# Altium PCB PCI Express Mini L1.PCBDOC (part 6 of 7)
Units mm, origin at the board's own origin, x right, y up, seen from the top; angles counter-clockwise.
Board outline 70 x 83.2 mm, 6 copper layers (TopLayer, Layer 1, Layer 2, Layer 3, Layer 4, Bottom Layer), stack 0.914 mm thick; 402 components, 242 nets, 1301 pads, 522 vias.
Unrouted connection lines stored in the file: 225.
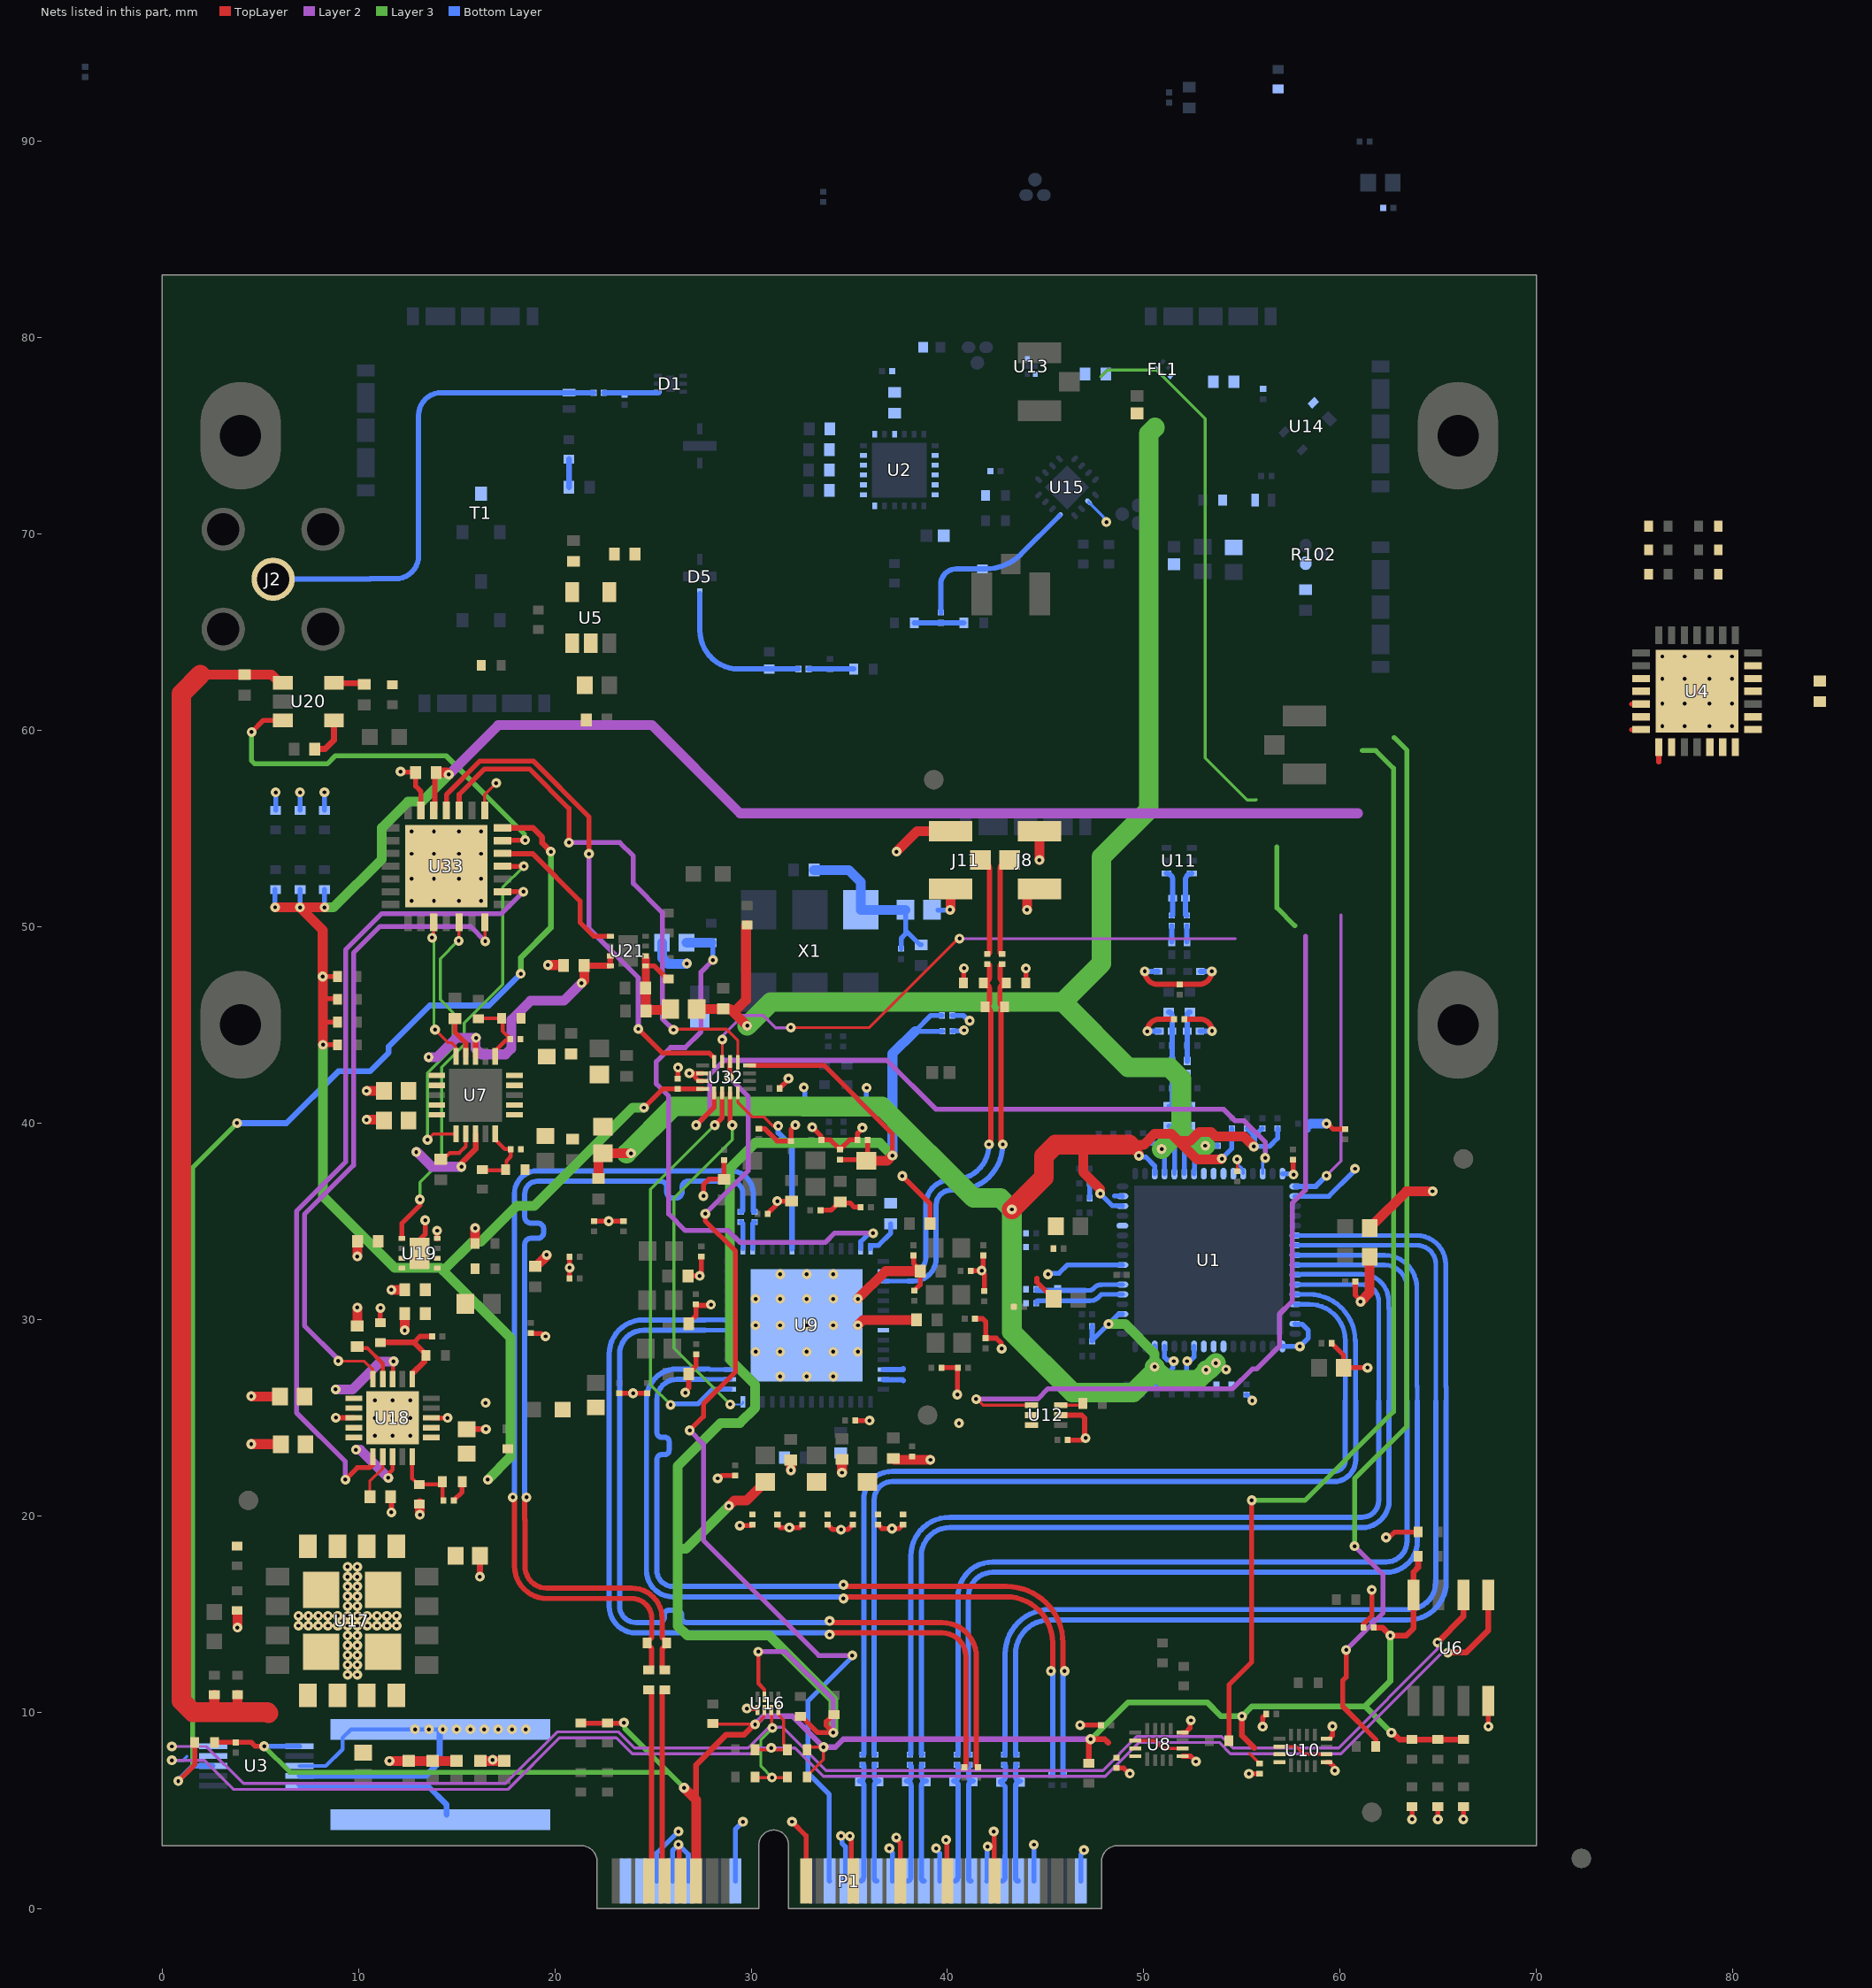
[diagram p7: the nets of this part, all layers, seen from the top]

## Via types
v1: diameter 0.5, hole 0.2, TopLayer to Bottom Layer, tented both sides, 311 vias
v2: diameter 0.5, hole 0.2, TopLayer to Bottom Layer, 211 vias

## Nets (pads, with @x,y where several pads share a name; then routed paths per layer and width w, separated by ;. In a path a pad name is that pad's centre, name@x,y a point inside that pad or via, vN(x,y) a via of type N, cw(c..) or ccw(c..) an arc to the next point about the centre after c; other vN are vias at no path point) (continued)
2V5@1A: C68.2 C99.2 C100.2 C101.2 C102.2 C103.2 C104.2 C105.2 C106.2 C107.2 C108.2 C109.2 C110.2 C111.2 FB7.2 U1.3 U1.8 U1.9 U1.10 U1.11 U1.39 U1.40 U1.41 U1.46 U1.50 U1.51 U1.62 U1.63 | length 86.1
  TopLayer w0.5: C68.2@22.227,37.183 22.227,38.266 22.428,38.466 FB7.2@22.448,38.466 v1@23.875,38.466 ; 46.921,38.898 46.921,37.495 47.775,36.641 v2(47.775,36.404) ; v1(49.749,38.329) 49.749,38.408 49.259,38.898 50.001,38.898 50.552,39.449 51.408,39.449 51.769,39.088 ; v2(53.969,38.188) 53.927,38.146 52.711,38.146 51.769,39.088 ; v1(55.603,38.802) 55.09,39.315 53.649,39.315 53.418,39.546 52.822,39.546 52.365,39.088 51.769,39.088
  TopLayer w1: v1(43.277,35.602) 44.913,37.238 44.913,38.312 45.499,38.898 46.921,38.898 49.259,38.898
  Layer 3 w0.5: v1(48.208,29.765) 49.051,29.765 50.552,28.264 v2(50.552,27.588)
  Layer 3 w1: v1@23.662,38.45 26.063,40.852 32.645,40.852 32.656,40.842 36.67,40.842 41.324,36.188 42.691,36.188 v1(43.277,35.602) 43.277,29.362 46.369,26.27 49.451,26.27 v2@50.617,27.437 ; v2(50.552,27.588) 50.552,27.503 51.13,26.925 52.766,26.925 v2@53.222,27.381 ; v2(53.178,27.426) 53.315,27.426 v2(53.671,27.782)
  Bottom Layer w0.25: C102.2@47.237,36.178 C100.2@47.237,36.924 47.237,36.934 47.262,36.959 47.432,36.959 ; C99.2@47.356,29.656 47.367,29.656 C101.2@47.367,28.893 47.392,28.918 47.392,28.948 48.708,30.265 48.899,30.265 U1.51@48.908,30.275 ; v2(47.775,36.404) 48.395,35.784 48.899,35.784 U1.62@48.908,35.775 ; v1@48.218,29.775 U1.50@48.908,29.775 ; 48.498,36.284 48.899,36.284 U1.63@48.908,36.275 ; C103.2@49.204,38.953 49.214,38.953 49.239,38.928 49.239,38.918 v1@49.789,38.368 ; v1@49.881,38.277 50.096,38.277 50.553,37.819 50.553,37.43 U1.3@50.558,37.425 ; v2(53.969,38.188) 54.483,38.702 C104.2@54.483,39.723 ; C105.2@55.258,39.723 55.268,39.723 55.293,39.698 55.293,39.688 55.555,39.427 55.555,38.85 v1(55.603,38.802) ; C106.2@56.033,39.723 56.023,39.723 55.651,39.351 55.651,38.85 v1(55.603,38.802) ; C107.2@56.808,39.723 56.808,39.22 56.39,38.802 v1(55.603,38.802)
  Bottom Layer w0.3: U1.46@50.558,28.625 50.558,27.632 50.652,27.539 C111.2@50.652,26.696
  other v1: 23.882,38.459
  other v2: 54.185,27.454
3V3@0A5: C78.2 C122.2 C123.2 C124.2 C125.2 FB1.1 FB4.2 R77.2 U1.4 U1.7 U1.42 U1.45 | length 78.8
  TopLayer w0.5: FB4.2@27.239,45.806 27.241,45.807 28.947,45.807 v1(29.801,44.954) 29.12,45.635 ; 29.195,45.709 29.74,46.255 29.74,50.019 29.776,50.055 R77.2@29.801,50.08
  Layer 3 w1: v1(29.801,44.954) 31.007,46.16 45.876,46.16 ; 50.566,75.414 50.25,75.099 50.25,55.95 47.841,53.541 47.841,48.124 45.876,46.16 ; v2(50.912,38.677) 51.849,39.614 51.903,39.56 ; v2(53.128,38.846) 52.617,38.846 51.903,39.56 ; 45.876,46.16 49.206,42.83 51.317,42.83 51.903,42.245 51.903,39.56
  Bottom Layer w0.25: C125.2@49.95,38.96 50.628,38.96 v2(50.912,38.677) 51.058,38.53 U1.4@51.058,37.425 ; U1.45@51.058,28.625 51.058,28.071 51.205,27.925 51.405,27.925 51.468,27.862 51.508,27.862 51.474,27.828 51.474,27.529 51.414,27.468 C123.2@51.414,26.689 ; C122.2@52.183,26.701 52.183,27.78 v1@52.278,27.875 ; v1(52.208,27.875) v1@52.278,27.875 ; U1.42@52.558,28.625 52.558,28.086 52.347,27.875 v1@52.278,27.875 ; U1.7@52.558,37.425 52.568,37.434 52.568,37.62 52.576,37.627 52.576,38.441 52.98,38.846 v2(53.128,38.846) C124.2@53.76,38.846
  other v1: 51.522,27.876
3V3@1A_1: C53.2 C54.2 C94.2 C150.2 C151.2 C154.2 C155.2 C166.2 C167.2 C195.2 C196.2 C207.2 C208.2 C240.2 C241.2 C242.2 FB15.1 FB16.1 FB19.1 FB23.1 FB26.1 R22.2 R23.2 R24.2 R30.2 R33.2 R34.2 R37.1 R38.1 R42.1 R43.2 R44.2 R52.1 R64.2 R78.2 U4.5 U12.5 U12.6 U16.7 U18.11 U18.12 U32.8 U32.16 U33.5 | length 211.7
  TopLayer w0.2: v1(30.366,13.078) 30.366,11.459 30.676,11.149 U16.7@30.676,10.779
  TopLayer w0.25: v2(8.184,47.461) R37.1@8.928,47.461 ; v2(8.2,43.984) R52.1@8.944,43.984 ; 8.2,45.148 R42.1@8.94,45.148 ; 8.2,46.326 R38.1@8.944,46.326 ; U33.5@13.832,55.929 13.892,55.989 13.892,57.765 C242.2@13.965,57.838 ; C53.2@14.859,20.784 14.859,20.794 15.281,21.215 R64.2@15.281,21.734 ; v1(24.541,40.783) 25.495,41.736 C240.2@26.262,41.736 U32.8@27.524,41.736 ; U32.16@29.924,42.936 33.708,42.936 37.195,39.449 v1(37.195,38.347) ; R43.2@32.509,9.79 32.559,9.79 33.391,8.958 v1(34.181,8.958) 33.821,9.318 33.821,9.524 34.171,9.874 R44.2@34.221,9.874 ; C154.2@34.529,38.14 35.814,38.14 FB16.1@35.866,38.088 35.941,38.163 C155.2@35.941,39.141
  TopLayer w0.5: v2(5.761,50.988) 5.769,50.98 v2(7.025,50.98) ; v2(8.2,43.984) 8.2,45.148 8.2,46.326 8.2,47.446 v2(8.184,47.461) 8.184,49.821 v2(7.025,50.98) ; v2(8.275,50.984) 8.271,50.98 v2(7.025,50.98) ; C242.2@13.965,57.838 13.978,57.851 14.506,57.851 v1(14.604,57.753) ; v1(28.869,20.5) 29.152,20.783 29.78,20.783 FB15.1@30.726,21.729 ; FB16.1@35.866,38.088 36.936,38.088 v1(37.195,38.347)
  Layer 2 w0.25: v1(30.366,13.078) 31.741,13.078 34.181,10.638 v1(34.181,8.958)
  Layer 2 w0.5: v1(14.604,57.753) 17.126,60.275 24.943,60.275 29.444,55.774 60.899,55.774
  Layer 3 w0.5: v2(8.2,43.984) 8.2,36.267 11.847,32.619 14.192,32.619 14.33,32.481 ; v2(8.275,50.984) 8.738,50.984 11.182,53.429 11.182,55.029 12.532,56.379 13.23,56.379 v1(14.604,57.753) ; v1(16.589,21.84) 17.748,22.999 17.748,29.063 14.33,32.481 ; v1(24.541,40.783) 23.959,40.783 18.957,35.78 18.066,35.78 16.236,33.951 15.799,33.951 14.33,32.481 ; v1(28.869,20.5) 26.694,18.325 26.259,18.325 ; v1(34.181,8.958) 34.181,10.648 30.926,13.903 26.748,13.903 26.259,14.392 26.259,18.325 ; v1(37.195,38.347) 36.553,38.99 30.194,38.99 28.91,37.706 28.91,27.959 30.194,26.676 30.194,25.483 29.425,24.714 28.447,24.714 26.259,22.526 26.259,18.325
  Bottom Layer w0.25: R30.2@5.758,51.902 5.759,51.9 5.759,50.99 v2(5.761,50.988) ; v2(7.025,50.98) 7.034,50.989 7.034,51.885 R34.2@7.042,51.894 ; v2(8.275,50.984) R33.2@8.275,51.898 ; C208.2@39.716,45.481 39.148,45.481 38.353,44.686 38.363,44.676 C207.2@39.737,44.676 C207.2@39.726,44.686
  Bottom Layer w0.5: v1(37.195,38.347) 37.195,43.528 38.353,44.686
3V3_MB: C19.1 C44.2 C50.2 C243.1 P1.11 R16.2 R17.1 R21.2 R27.2 R48.2 R54.2 R69.2 R72.1 R83.2 R111.1 R112.1 U3.6 U6.8 U8.6 U8.14 U8.15 U8.16 U10.6 U10.14 U10.15 U10.16 U16.2 | length 107.9
  TopLayer w0.15: R72.1@28.05,9.419 28.074,9.396 30.174,9.396 v1@30.18,9.389 ; v1@30.363,9.463 30.651,9.751 30.651,9.919 30.676,9.944 U16.2@30.676,10.109 ; R17.1@32.849,6.705 32.849,6.755 33.685,7.591 v1(33.685,8.219) 32.987,8.219 R16.2@32.849,8.081 ; U8.14@49.57,8.558 50.558,8.558 50.958,8.158 U8.6@51.97,8.158 ; 55.404,7.879 C19.1@55.895,7.388 ; U10.14@56.903,8.253 57.758,8.253 58.158,7.853 U10.6@59.303,7.853
  TopLayer w0.25: R83.2@2.664,8.462 4.555,8.462 4.753,8.263 v1(5.2,8.263) ; R111.1@21.333,9.444 R112.1@22.691,9.444 23.497,9.444 v1(23.521,9.468)
  TopLayer w0.3: 27.2,5.535 27.2,7.319 28.739,8.858 29.649,8.858 v1@30.18,9.389 ; R48.2@47.201,7.393 47.201,8.481 47.345,8.625 48.011,8.625 48.185,8.451 ; v1(54.998,9.79) 54.998,8.804 55.623,8.179 ; C50.2@61.709,14.306 62.144,14.306 v1(62.55,13.9) 63.363,13.9 63.735,14.272 U6.8@63.735,15.975 63.735,17.135 63.973,17.373 R27.2@63.973,17.943 ; v1(62.609,8.958) 62.663,8.958 63.013,8.608 R54.2@63.656,8.608 R69.2@64.973,8.608 R21.2@66.275,8.608
  TopLayer w0.5: v2(26.585,6.15) 27.2,5.535 P1.11@27.2,1.4
  Layer 2 w0.3: v1(30.201,9.375) 30.626,9.8 32.104,9.8 v1(33.685,8.219) 34.29,8.219 34.697,8.625 v1(47.291,8.625)
  Layer 2 w0.5: v2(26.585,6.15) v2@26.597,6.15
  Layer 3 w0.25: v1(5.2,8.263) 6.524,6.94 25.795,6.94 ; v1(23.521,9.468) 23.569,9.42 23.569,9.166 25.795,6.94 ; v2(26.585,6.15) 25.795,6.94
  Layer 3 w0.3: v1(47.291,8.625) 47.327,8.625 49.202,10.5 53.225,10.5 53.935,9.79 v1(54.998,9.79) 55.509,10.3 61.267,10.3 ; v1(62.55,13.9) 62.55,11.583 61.267,10.3 ; v1(62.609,8.958) 61.267,10.3
  Bottom Layer w0.25: v1(5.2,8.263) U3.6@7.005,8.263
3V6_DCDC: C40.2 C43.2 C49.2 C52.2 C55.2 C62.2 C65.2 R61.2 U7.1 U7.2 U7.4 U7.5 U7.8 U7.18 U17.9 U17.10 U17.11 U17.12 U18.1 U18.2 U18.4 U18.5 U18.8 U18.18 U19.7 U19.8 U21.7 U21.8 | length 27.4
  TopLayer w0.2: v2(11.526,21.934) 11.583,21.991 11.583,22.187 11.742,22.346 U18.8@11.742,23.012 ; U18.18@11.742,26.962 11.767,26.987 11.767,27.838 v2(11.792,27.863)
  TopLayer w0.3: v2(15.251,37.777) 15.251,37.913 15.251,37.953 15.97,38.673 U7.8@15.97,39.448 ; U7.18@15.97,43.398 15.97,44.312 v2(15.995,44.337) ; C65.2@21.498,48.019 21.503,48.014 22.826,48.014 U21.8@22.831,48.009 U21.7@22.831,48.509
  TopLayer w0.5: v1(21.37,47.133) 21.498,47.261 C65.2@21.498,48.019
  Layer 2 w0.5: v2(8.843,26.44) 9.694,26.44 11.114,27.86 11.789,27.86 v2(11.792,27.863) ; v2(9.882,23.362) 10.097,23.362 v2(11.526,21.934) ; v2(12.948,38.523) 12.987,38.523 13.733,37.777 v2(15.251,37.777) ; v2(13.579,43.353) 13.993,43.353 14.003,43.344 14.996,44.337 v2(15.995,44.337) 15.97,44.312 15.97,43.791 16.263,43.498 17.499,43.498 17.791,43.791 17.791,45.254 18.772,46.234 20.472,46.234 v1(21.37,47.133)
5V: C61.2 FB2.1 FB3.1 R76.2 U20.5 | length 1.5
  TopLayer w0.3: U20.5@8.758,62.412 8.77,62.401 C61.2@10.223,62.401
5V_ANT: C24.2 C30.2 R31.1 T1.3 U5.5 | length 1.4
  Bottom Layer w0.3: C30.2@20.723,72.38 R31.1@20.723,73.803
12V: C37.2 C48.2 C60.2 C70.2 R15.2 R62.2 R80.2 U3.8 U3.9 U5.1 U17.1 U17.2 U17.3 U17.4 U20.1 | length 81
  TopLayer w0.3: v1(14.298,9.131) v1@14.336,9.093
  TopLayer w0.5: 1.958,62.834 1.963,62.84 C60.2@4.206,62.84 5.581,62.84 6.008,62.412 U20.1@6.158,62.412 ; R80.2@2.664,10.885 2.664,10.011 2.672,10.003 ; 3.816,10.003 3.842,10.029 R62.2@3.842,10.885
  TopLayer w1: 1.958,62.834 0.98,61.857 0.98,10.589 1.566,10.003 2.672,10.003 3.816,10.003 5.37,10.003 5.429,9.944
  Bottom Layer w0.2: U3.8@7.005,7.263 8.344,7.263 9.194,8.113 9.194,8.703 9.619,9.128 R15.2@14.174,9.128
  Bottom Layer w0.3: U3.9@7.005,6.763 13.449,6.763 14.144,7.459 14.144,9.098 R15.2@14.174,9.128
  other v1: 12.887,9.131 13.593,9.131 15.003,9.131 15.708,9.131 16.414,9.131 17.119,9.131 17.824,9.131 18.529,9.131
04610_RESET: U9.15 U32.10 | length 21.2
  TopLayer w0.25: v1(28.144,39.892) 28.524,40.272 U32.10@28.524,41.536
  Layer 3 w0.15: v1(25.901,25.65) 24.875,26.676 24.875,36.623 v1(28.144,39.892)
  Bottom Layer w0.25: v1(25.901,25.65) 25.945,25.695 27.285,25.695 28.039,26.45 U9.15@28.931,26.45
04610_RESET_3.3: U4.28 U32.3 | length 30
  TopLayer w0.15: U32.3@28.524,43.136 28.532,43.145 28.532,44.246 v1(28.526,44.252) ; v1(32.024,44.862) 36.035,44.862 40.563,49.39 v1(40.615,49.39)
  Layer 2 w0.15: v1(28.526,44.252) 28.526,44.422 29.583,45.479 30.618,45.479 31.246,44.851 32.013,44.851 v1(32.024,44.862) ; v1(40.615,49.39) 54.667,49.39
04610_STATUS0: R74.2 U12.3 | length 1.2
  TopLayer w0.15: U12.3@45.76,25.627 46.797,25.627 R74.2@46.893,25.724
04610_STATUS0_3V3: U4.26 U12.4 | length 45.3
  TopLayer w0.15: v1(41.464,25.942) 41.505,25.942 41.821,25.627 U12.4@44.28,25.627
  Layer 2 w0.25: v1(41.464,25.942) 44.589,25.942 45.119,26.473 54.519,26.473 55.524,27.477 55.738,27.477 56.908,28.648 56.908,30.275 57.558,30.925 57.558,35.918 58.228,36.588 58.228,40.213 58.228,49.507
  Layer 3 w0.25: 56.778,54.065 56.778,50.957 57.688,50.048
04610_SYNC: U9.14 U32.11 | length 19.1
  TopLayer w0.25: U32.11@28.924,41.536 28.924,40.079 29.044,39.959 v1(29.044,39.892)
  Layer 3 w0.15: v2(28.933,25.673) 26.063,28.543 26.063,36.168 29.044,39.149 v1(29.044,39.892)
  Bottom Layer w0.1: v2(28.933,25.673) 29.511,25.673 29.581,25.743 U9.14@29.581,25.8
04610_SYNC_3V3: P1.20 U32.2 | length 50.5
  TopLayer w0.25: v1(26.871,24.351) 27.576,25.056 27.576,25.7 29.205,27.329 29.205,33.483 27.666,35.021 v1(27.666,35.379) ; v1(28.869,42.336) 28.899,42.366 28.899,43.111 U32.2@28.924,43.136
  Layer 2 w0.25: v1(26.871,24.351) 27.576,23.647 27.576,18.752 33.438,12.89 v1(35.153,12.89) ; v1(27.666,35.379) 29.862,37.575 29.862,41.343 v1(28.869,42.336)
  Bottom Layer w0.25: P1.20@34,1.4 33.981,1.419 33.981,5.811 32.9,6.891 32.9,10.569 35.153,12.823 v1(35.153,12.89)
9690_FAST_DETECT: U1.17 U4.27 | length 15.4
  Layer 2 w0.15: v2(59.3,37.322) 60.045,38.068 60.045,50.595
  Bottom Layer w0.279: U1.17@57.708,36.775 58.752,36.775 v2(59.3,37.322)
9690_PDWN: U1.14 U32.9 | length 36.9
  TopLayer w0.25: v1(27.199,39.892) 28.124,40.817 U32.9@28.124,41.536
  Layer 2 w0.25: v1(27.199,39.892) 27.887,40.579 27.887,42.449 28.631,43.194 36.924,43.194 39.414,40.703 54.063,40.703 54.648,40.118 55.099,40.118 56.178,39.04 v1(56.178,38.227)
  Bottom Layer w0.15: U1.14@56.058,37.425 56.058,38.013 56.178,38.132 v1(56.178,38.227)
9690_PDWN_3.3: U32.4 U33.4 | length 26.2
  TopLayer w0.25: U33.4@14.482,55.929 14.482,56.72 16.197,58.434 18.904,58.434 21.735,55.603 21.735,53.715 v1(21.742,53.707) ; v1(24.255,44.791) 25.485,43.561 27.874,43.561 U32.4@28.099,43.336
  Layer 2 w0.25: v1(21.742,53.707) 21.742,49.91 24.255,47.397 v1(24.255,44.791)
9690_V_1P0: C69.2 U1.12 | length 1.5
  TopLayer w0.15: C69.2@54.753,37.547 v2(54.753,38.152)
  Bottom Layer w0.15: v2(54.753,38.152) 54.81,38.094 54.81,37.875 54.983,37.702 54.983,37.69 55.058,37.615 U1.12@55.058,37.425
+12: P1.2 P1.4 R15.1 U3.10 | length 8.4
  Bottom Layer w0.3: U3.10@7.005,6.263 13.519,6.263 14.494,5.288 R15.1@14.494,4.769
ADC_CLK9690_N: C187.2 R14.1 U1.54 | length 4.5
  Bottom Layer w0.24: 47.006,31.478 47.182,31.478 ccw(c47.182,31.902) 47.411,31.545 47.488,31.621 cw(c47.834,31.275) 47.823,31.764 ccw(c47.528,32.08) 47.834,31.775 U1.54@48.908,31.775
  Bottom Layer w0.268: C187.2@44.518,31.534 ccw(c44.574,31.534) 44.574,31.478 47.006,31.478
ADC_CLK9690_P: C186.2 R14.2 U1.53 | length 4.6
  Bottom Layer w0.24: 47.006,30.95 47.258,30.95 ccw(c47.258,31.556) 47.686,31.127 47.834,31.275 U1.53@48.908,31.275
  Bottom Layer w0.268: C186.2@44.518,30.83 cw(c44.638,30.83) 44.638,30.95 47.006,30.95
Alert: R83.1 U3.3 U33.28 | length 67
  TopLayer w0.25: v1(0.827,6.495) 1.672,7.339 R83.1@1.672,8.462
  TopLayer w0.3: U33.28@17.332,55.029 18.891,55.029 19.356,54.564 19.356,54.268 v1(19.801,53.824)
  Layer 3 w0.25: v1(0.827,6.495) 1.566,7.233 1.566,37.74 v1(3.822,39.996)
  Layer 3 w0.3: v1(18.272,47.604) 18.272,48.417 19.801,49.946 v1(19.801,53.824)
  Bottom Layer w0.25: v1(0.827,6.495) 0.827,6.541 1.549,7.263 U3.3@2.605,7.263
  Bottom Layer w0.3: v1(3.822,39.996) 6.337,39.996 8.977,42.636 10.594,42.636 11.538,43.58 11.538,43.89 13.632,45.984 16.652,45.984 v1(18.272,47.604)
AN_IN_9690_N: R4.2 U1.5 | length 2.6
  Bottom Layer w0.24: R4.2@51.279,39.841 cw(c51.279,39.556) 51.564,39.556 51.564,37.665 cw(c51.324,37.664) 51.562,37.635 ccw(c52.058,37.575) 51.558,37.575 U1.5@51.558,37.425
AN_IN_9690_P: R13.2 U1.6 | length 2.6
  Bottom Layer w0.24: U1.6@52.058,37.425 52.058,38.796 52.064,38.796 52.064,39.556 cw(c52.349,39.556) R13.2@52.349,39.841
AN_IN_N: C3.1 R7.2 U11.4 | length 2.4
  Bottom Layer w0.268: U11.4@51.148,52.714 cw(c51.148,52.389) 51.473,52.389 R7.2@51.473,51.452 51.473,50.621 cw(c51.42,50.621) C3.1@51.42,50.568
AN_IN_P: C6.1 R7.1 U11.3 | length 2.4
  Bottom Layer w0.268: C6.1@52.195,50.568 cw(c52.195,50.64) 52.123,50.64 R7.1@52.123,51.452 52.123,52.389 cw(c52.448,52.389) U11.3@52.448,52.714
ATT_V1: R39.2 U4.17
ATT_V2: U2.20 U4.18
ATT_V3: U2.21 U4.19 | length 0.5
  TopLayer w0.25: 74.841,61.338 U4.19@75.313,61.338
ATT_V4: U2.22 U4.20
ATT_V5: U2.23 U4.21 | length 0.5
  TopLayer w0.25: 74.841,60.038 U4.21@75.313,60.038
ATT_V6: U2.24 U4.22 | length 0.7
  TopLayer w0.25: 76.225,58.386 U4.22@76.225,59.109
CLKin1_1_N: C225.1 R94.2 R95.1 | length 45.9
  TopLayer w0.268: v1(18.559,20.944) ccw(c18.559,20.858) 18.473,20.858 18.473,19.817 18.482,19.817 18.482,17.434 ccw(c19.599,17.434) 19.599,16.317 23.925,16.317 cw(c23.925,14.77) 25.471,14.77 25.471,13.805 25.707,13.569 R95.1@25.707,13.519 25.707,13.469 25.463,13.224 25.463,12.392 25.472,12.383 25.472,12.235 25.563,12.144 R94.2@25.613,12.144
  Bottom Layer w0.268: v1(18.559,20.944) cw(c18.559,21.03) 18.473,21.03 18.473,32.91 18.473,33.82 cw(c18.784,33.82) 18.784,34.13 19.127,34.13 ccw(c19.127,34.44) 19.438,34.44 19.438,34.596 ccw(c19.127,34.596) 19.127,34.906 18.784,34.906 cw(c18.784,35.216) 18.473,35.216 18.473,35.78 18.473,36.399 cw(c19.112,36.399) 19.112,37.038 24.486,37.038 25.396,37.038 cw(c25.396,36.728) 25.706,36.728 25.706,36.492 ccw(c26.017,36.492) 26.017,36.182 26.172,36.182 ccw(c26.172,36.492) 26.482,36.492 26.482,36.728 cw(c26.793,36.728) 26.793,37.038 27.315,37.038 28.953,37.038 cw(c28.953,36.414) 29.578,36.414 29.578,35.59 cw(c29.468,35.59) C225.1@29.468,35.48
CLKin1_1_P: C226.1 R95.2 R96.2 | length 45
  TopLayer w0.268: v1(17.859,20.944) cw(c17.859,20.858) 17.945,20.858 17.945,19.289 17.954,19.289 17.954,17.434 ccw(c19.599,17.434) 19.599,15.789 23.925,15.789 cw(c23.925,14.77) 24.943,14.77 24.943,13.805 24.707,13.569 R95.2@24.707,13.519 24.707,13.469 24.935,13.242 24.935,12.393 24.925,12.384 24.925,12.236 24.834,12.145 R96.2@24.784,12.145
  Bottom Layer w0.268: v1(17.859,20.944) ccw(c17.859,21.03) 17.945,21.03 17.945,36.399 cw(c19.112,36.399) 19.112,37.566 28.953,37.566 cw(c28.953,36.414) 30.106,36.414 30.106,35.562 ccw(c30.187,35.562) C226.1@30.187,35.48
CLKin1_N: P1.7 R94.1 | length 9.9
  TopLayer w0.268: P1.7@25.6,1.4 cw(c25.6,1.536) 25.464,1.536 25.464,3.925 25.464,4.823 25.464,10.515 25.463,10.517 25.463,10.896 25.472,10.905 25.472,11.053 25.563,11.144 R94.1@25.613,11.144
CLKin1_P: P1.5 R96.1 | length 9.9
  TopLayer w0.268: R96.1@24.784,11.145 24.834,11.145 24.925,11.054 24.925,10.906 24.935,10.897 24.935,10.298 24.936,10.297 24.936,4.823 24.936,3.925 24.936,1.536 cw(c24.8,1.536) P1.5@24.8,1.4
CLKout1_N: C189.1 U9.17 | length 43.6
  TopLayer w0.268: v1(34.7,15.789) cw(c34.786,15.789) 34.786,15.875 42.998,15.875 cw(c42.998,13.519) 45.354,13.519 45.354,12.182 cw(c45.268,12.182) v1(45.268,12.096)
  Bottom Layer w0.24: 27.659,27.478 27.852,27.478 27.88,27.45 U9.17@28.931,27.45
  Bottom Layer w0.268: 27.659,27.478 26.226,27.478 ccw(c26.226,25.924) 24.672,25.924 24.672,17.219 ccw(c26.017,17.219) 26.017,15.875 34.614,15.875 cw(c34.614,15.789) v1(34.7,15.789) ; v1(45.268,12.096) cw(c45.268,12.01) 45.354,12.01 45.354,6.851 cw(c45.306,6.851) C189.1@45.306,6.803
CLKout1_P: C188.1 U9.16 | length 43.6
  TopLayer w0.268: v1(34.7,16.489) ccw(c34.786,16.489) 34.786,16.403 42.998,16.403 cw(c42.998,13.519) 45.882,13.519 45.882,12.182 ccw(c45.968,12.182) v1(45.968,12.096)
  Bottom Layer w0.24: 27.659,26.95 U9.16@28.931,26.95
  Bottom Layer w0.268: 27.659,26.95 26.226,26.95 ccw(c26.226,25.924) 25.2,25.924 25.2,24.714 25.2,24.265 ccw(c25.468,24.265) 25.468,23.997 25.605,23.997 cw(c25.605,23.778) 25.825,23.778 25.825,23.339 cw(c25.605,23.339) 25.605,23.119 25.468,23.119 ccw(c25.468,22.851) 25.2,22.851 25.2,21.84 25.2,17.219 ccw(c26.017,17.219) 26.017,16.403 34.614,16.403 ccw(c34.614,16.489) v1(34.7,16.489) ; C188.1@45.93,6.803 cw(c45.93,6.851) 45.882,6.851 45.882,12.01 cw(c45.968,12.01) v1(45.968,12.096)
CLKout3_N: C228.1 U9.22 | length 45.4
  TopLayer w0.268: v1(34,13.948) 34,13.958 cw(c34.076,13.958) 34.076,14.034 39.729,14.034 cw(c39.729,12.82) 40.943,12.82 40.943,7.285 cw(c40.85,7.285) C228.1@40.85,7.193
  Bottom Layer w0.24: 27.659,29.978 28.903,29.978 cw(c28.903,29.95) U9.22@28.931,29.95
  Bottom Layer w0.268: 27.659,29.978 24.52,29.978 ccw(c24.52,28.23) 22.772,28.23 22.772,15.403 ccw(c24.141,15.403) 24.141,14.034 33.914,14.034 cw(c33.914,13.948) v1(34,13.948)
CLKout3_P: C227.1 U9.21 | length 45.4
  TopLayer w0.268: v1(34,14.648) 34,14.638 ccw(c34.076,14.638) 34.076,14.562 39.729,14.562 cw(c39.729,12.82) 41.471,12.82 41.471,7.285 ccw(c41.564,7.285) C227.1@41.564,7.193
  Bottom Layer w0.24: 27.659,29.45 U9.21@28.931,29.45
  Bottom Layer w0.268: 27.659,29.45 24.52,29.45 ccw(c24.52,28.23) 23.3,28.23 23.3,15.403 ccw(c24.141,15.403) 24.141,14.562 24.74,14.562 25.311,14.562 ccw(c25.311,14.83) 25.579,14.83 25.579,14.967 cw(c25.798,14.967) 25.798,15.187 26.237,15.187 cw(c26.237,14.967) 26.456,14.967 26.456,14.83 ccw(c26.724,14.83) 26.724,14.562 27.736,14.562 33.914,14.562 ccw(c33.914,14.648) v1(34,14.648)
CLKout6_N: C224.1 R92.2 R97.2 U9.44 | length 20.2
  TopLayer w0.268: C224.1@42.034,48.09 cw(c42.034,47.979) 42.145,47.979 42.145,47.464 cw(c41.818,47.464) R97.2@41.818,47.138 cw(c41.818,46.813) 42.143,46.813 42.143,46.152 cw(c41.907,46.152) R92.2@41.907,45.916 cw(c41.907,45.621) 42.202,45.621 42.202,38.998 cw(c42.116,38.998) v1(42.116,38.912)
  Bottom Layer w0.24: U9.44@36.731,32.45 37.886,32.45 37.886,32.452 cw(c37.912,32.452) 37.912,32.478 37.996,32.478
  Bottom Layer w0.268: 37.996,32.478 38.263,32.478 ccw(c38.263,33.109) 38.895,33.109 38.895,35.829 cw(c40.175,35.829) 40.175,37.108 40.313,37.108 ccw(c40.313,38.912) v1(42.116,38.912)
CLKout6_P: C223.1 R41.2 R92.1 U9.45 | length 21.1
  TopLayer w0.268: C223.1@42.784,48.09 ccw(c42.784,47.979) 42.673,47.979 42.673,47.463 ccw(c42.996,47.463) R41.2@42.996,47.139 ccw(c42.996,46.814) 42.671,46.814 42.671,46.152 ccw(c42.907,46.152) R92.1@42.907,45.916 ccw(c42.907,45.74) 42.73,45.74 42.73,38.998 ccw(c42.816,38.998) v1(42.816,38.912)
  Bottom Layer w0.24: U9.45@36.731,31.95 37.996,31.95
  Bottom Layer w0.268: 37.996,31.95 38.263,31.95 ccw(c38.263,33.109) 39.423,33.109 39.423,35.829 cw(c40.175,35.829) 40.175,36.58 40.485,36.58 ccw(c40.485,38.912) v1(42.816,38.912)
CLKout6O_N: C224.2 J11.2 | length 5.1
  TopLayer w0.268: J11.2@41.682,53.391 cw(c41.682,52.928) 42.145,52.928 42.145,48.721 cw(c42.034,48.721) C224.2@42.034,48.61
CLKout6O_P: C223.2 J8.2 | length 5.1
  TopLayer w0.268: C223.2@42.784,48.61 cw(c42.784,48.721) 42.673,48.721 42.673,52.904 cw(c43.16,52.904) J8.2@43.16,53.391
CLKout8_N: C183.1 U9.50
CLKout8_P: C185.1 U9.49
CLKout10_N: C187.1 U9.54 | length 1
  Bottom Layer w0.268: U9.54@36.726,27.45 37.7,27.45 ccw(c37.7,27.497) 37.748,27.497
CLKout10_P: C186.1 U9.55 | length 1
  Bottom Layer w0.268: U9.55@36.726,26.922 37.7,26.922 cw(c37.7,26.874) 37.748,26.874
CMLout1_ADC_N: C15.1 U1.22 | length 53.9
  Bottom Layer w0.24: U1.22@57.708,34.275 63.897,34.275 cw(c63.897,32.801) 65.371,32.801 65.371,26.572 cw(c65.371,26.544) 65.399,26.544 65.399,25.857
  Bottom Layer w0.268: C15.1@43.516,7.841 cw(c43.516,7.893) 43.464,7.893 43.464,12.961 cw(c45.2,12.961) 45.2,14.697 63.46,14.697 ccw(c63.46,16.636) 65.399,16.636 65.399,25.857
CMLout1_ADC_P: C16.1 U1.23 | length 53.1
  Bottom Layer w0.24: U1.23@57.708,33.775 63.897,33.775 cw(c63.897,32.801) 64.871,32.801 64.871,25.857
  Bottom Layer w0.268: C16.1@42.884,7.841 ccw(c42.884,7.893) 42.936,7.893 42.936,12.961 cw(c45.2,12.961) 45.2,15.225 63.46,15.225 ccw(c63.46,16.636) 64.871,16.636 64.871,25.857
CMLout1_N: C15.2 P1.44 R98.2 | length 6.3
  Bottom Layer w0.268: C15.2@43.516,7.321 ccw(c43.516,7.278) 43.473,7.278 43.473,6.721 ccw(c43.709,6.721) R98.2@43.709,6.485 ccw(c43.709,6.249) 43.473,6.249 43.473,1.527 ccw(c43.6,1.527) P1.44@43.6,1.4
CMLout1_P: C16.2 P1.42 R98.1 | length 6.2
  Bottom Layer w0.268: P1.42@42.8,1.4 42.936,1.536 42.936,2.701 42.941,2.706 42.941,6.203 42.709,6.435 R98.1@42.709,6.485 ccw(c42.709,6.721) 42.945,6.721 42.945,7.26 ccw(c42.884,7.26) C16.2@42.884,7.321
CMLout2_ADC_N: C17.1 U1.24 | length 52.6
  Bottom Layer w0.24: U1.24@57.708,33.275 62.25,33.275 cw(c62.25,31.625) 63.9,31.625 63.9,26.593 cw(c63.9,26.565) 63.928,26.565 63.928,25.857
  Bottom Layer w0.268: C17.1@41.116,7.841 cw(c41.116,7.893) 41.064,7.893 41.064,15.886 cw(c42.3,15.886) 42.3,17.122 62.339,17.122 ccw(c62.339,18.712) 63.928,18.712 63.928,25.857
CMLout2_ADC_P: C18.1 U1.25 | length 51.8
  Bottom Layer w0.24: U1.25@57.708,32.775 62.25,32.775 cw(c62.25,31.625) 63.4,31.625 63.4,25.857
  Bottom Layer w0.268: C18.1@40.484,7.841 ccw(c40.484,7.893) 40.536,7.893 40.536,15.886 cw(c42.3,15.886) 42.3,17.65 62.339,17.65 ccw(c62.339,18.712) 63.4,18.712 63.4,25.857
CMLout2_N: C17.2 P1.38 R104.2 | length 6.3
  Bottom Layer w0.268: C17.2@41.116,7.321 ccw(c41.116,7.279) 41.074,7.279 41.074,6.729 ccw(c41.31,6.729) 41.31,6.493 ccw(c41.31,6.257) 41.074,6.257 41.074,1.526 ccw(c41.2,1.526) P1.38@41.2,1.4
CMLout2_P: C18.2 P1.36 R104.1 | length 6.3
  Bottom Layer w0.268: P1.36@40.4,1.4 ccw(c40.268,1.633) 40.536,1.634 40.536,2.55 cw(c40.9,2.55) 40.542,2.614 ccw(c40.278,2.661) 40.546,2.663 40.546,6.257 ccw(c40.31,6.257) R104.1@40.31,6.493 ccw(c40.31,6.729) 40.546,6.729 40.546,7.259 ccw(c40.484,7.259) C18.2@40.484,7.321
CMLout3_ADC_N: C35.1 U1.26 | length 51.3
  Bottom Layer w0.24: U1.26@57.708,32.275 57.858,32.275 ccw(c57.858,32.775) 58.023,32.303 61.106,32.303 cw(c61.106,30.947) 62.462,30.947 62.462,30.579 cw(c62.462,30.551) 62.49,30.551 62.49,25.857
  Bottom Layer w0.268: C35.1@38.716,7.841 cw(c38.716,7.893) 38.664,7.893 38.664,17.956 cw(c40.107,17.956) 40.107,19.399 61.109,19.399 ccw(c61.109,20.78) 62.49,20.78 62.49,25.857
CMLout3_ADC_P: C36.1 U1.27 | length 50.5
  Bottom Layer w0.24: U1.27@57.708,31.775 61.106,31.775 cw(c61.106,30.919) 61.962,30.919 61.962,25.857
  Bottom Layer w0.268: C36.1@38.084,7.841 ccw(c38.084,7.893) 38.136,7.893 38.136,17.956 cw(c40.107,17.956) 40.107,19.927 61.109,19.927 ccw(c61.109,20.78) 61.962,20.78 61.962,25.857
CMLout3_N: C35.2 P1.32 R105.2 | length 6.3
  Bottom Layer w0.268: C35.2@38.716,7.321 ccw(c38.716,7.28) 38.675,7.28 38.675,6.729 ccw(c38.911,6.729) 38.911,6.493 ccw(c38.911,6.257) 38.675,6.257 38.675,1.525 ccw(c38.8,1.525) P1.32@38.8,1.4
CMLout3_P: C36.2 P1.30 R105.1 | length 6.3
  Bottom Layer w0.268: P1.30@38,1.4 ccw(c37.868,1.633) 38.136,1.634 38.136,2.55 cw(c38.5,2.55) 38.142,2.616 ccw(c37.879,2.665) 38.147,2.666 38.147,6.257 ccw(c37.911,6.257) R105.1@37.911,6.493 ccw(c37.911,6.729) 38.147,6.729 38.147,7.259 ccw(c38.084,7.259) C36.2@38.084,7.321
CMLout4_ADC_N: C38.1 U1.28 | length 49.2
  Bottom Layer w0.24: U1.28@57.708,31.275 58.408,31.275 cw(c58.408,28.923) 60.761,28.923 cw(c60.761,28.895) 60.789,28.895 60.789,25.857
  Bottom Layer w0.268: C38.1@36.319,7.841 cw(c36.319,7.895) 36.265,7.895 36.265,11.321 36.265,15.149 36.265,20.824 cw(c37.18,20.824) 37.18,21.738 59.674,21.738 ccw(c59.674,22.853) 60.789,22.853 60.789,25.857
CMLout4_ADC_P: C39.1 U1.29 | length 48.4
  Bottom Layer w0.24: U1.29@57.708,30.775 58.408,30.775 cw(c58.408,28.923) 60.261,28.923 60.261,25.857
  Bottom Layer w0.268: C39.1@35.684,7.841 ccw(c35.684,7.895) 35.737,7.895 35.737,20.824 cw(c37.18,20.824) 37.18,22.266 59.674,22.266 ccw(c59.674,22.853) 60.261,22.853 60.261,25.857
CMLout4_N: C38.2 P1.26 R113.2 | length 6.3
  Bottom Layer w0.268: C38.2@36.319,7.321 ccw(c36.319,7.275) 36.272,7.275 36.272,6.729 ccw(c36.508,6.729) 36.508,6.493 ccw(c36.508,6.257) 36.272,6.257 36.272,1.528 ccw(c36.4,1.528) P1.26@36.4,1.4
CMLout4_P: C39.2 P1.24 R113.1 | length 6.3
  Bottom Layer w0.268: P1.24@35.6,1.4 ccw(c35.468,1.633) 35.736,1.634 35.736,2.55 cw(c36.1,2.55) 35.741,2.609 ccw(c35.476,2.653) 35.744,2.654 35.744,6.257 ccw(c35.508,6.257) R113.1@35.508,6.493 ccw(c35.508,6.729) 35.744,6.729 35.744,7.26 ccw(c35.684,7.26) C39.2@35.684,7.321
CTRL_VCXO: C222.1 R89.1 U9.41 | length 29.4
  Layer 2 w0.25: v2(28.06,48.299) 27.447,47.687 27.447,44.645 26.649,43.846 25.896,43.846 25.175,43.125 25.175,42 25.806,41.369 25.806,35.368 26.649,34.525 28.835,34.525 29.435,33.925 33.777,33.925 34.241,34.389 v2(36.215,34.389)
  Bottom Layer w0.25: R89.1@27.969,49.179 28.06,49.088 v2(28.06,48.299) ; U9.41@35.581,33.6 35.584,33.602 35.584,33.96 36.013,34.389 v2(36.215,34.389)
  Bottom Layer w0.5: C222.1@26.714,49.179 R89.1@27.969,49.179
EN_1V8_LDO1: U18.6 U33.23 | length 42.5
  TopLayer w0.25: v1(9.337,21.84) 9.947,22.45 10.581,22.45 10.727,22.596 10.727,22.997 U18.6@10.742,23.012 ; U33.23@17.332,51.779 v1(18.401,51.779)
  Layer 2 w0.25: v1(9.337,21.84) 9.337,22.763 6.85,25.25 6.85,35.512 9.352,38.014 9.352,48.825 11.19,50.663 17.286,50.663 v1(18.401,51.779)
EN_1V25_LDO0: U7.20 U33.17 | length 7.5
  TopLayer w0.15: v1(13.751,49.435) 13.834,49.517 U33.17@13.832,50.229 U33.17@13.832,50.229 ; v1(13.906,44.761) 14.577,44.09 14.749,44.09 14.97,43.869 U7.20@14.97,43.398
  Layer 3 w0.15: v1(13.751,49.435) 13.763,49.435 13.851,49.347 13.851,44.816 v1(13.906,44.761)
EN_1V25_LDO2: U19.5 U33.25 | length 22.6
  TopLayer w0.25: U19.5@12.217,34.119 12.217,34.894 13.132,35.808 v1(13.132,36.107) ; U33.25@17.332,53.079 v1(18.426,53.079)
  Layer 3 w0.15: v1(13.132,36.107) 13.132,36.976 14.245,38.09 14.245,42.853 15.386,43.993 15.386,45.103 17.35,47.067 17.35,52.002 v1(18.426,53.079)
EN_2V5_LDO0: U7.6 U33.19 | length 13.9
  TopLayer w0.15: v1(13.519,39.151) 13.816,39.448 U7.6@14.97,39.448 ; v1(15.11,49.28) 15.11,49.309 15.121,49.32 15.121,50.218 U33.19@15.132,50.229
  Layer 3 w0.15: v1(13.519,39.151) 13.519,42.551 14.83,43.862 14.83,45.625 14.174,46.281 14.174,48.373 15.081,49.28 v1(15.11,49.28)
EN_3V3_LDO1: U18.20 U33.21 | length 33.5
  TopLayer w0.15: v1(8.975,27.887) 8.989,27.873 10.309,27.873 10.742,27.439 U18.20@10.742,26.962 ; U33.21@16.432,50.229 16.446,50.215 16.446,49.274 v1(16.461,49.26)
  Layer 2 w0.25: v1(8.975,27.887) 8.975,27.955 7.25,29.68 7.25,35.346 9.752,37.848 9.752,48.659 11.103,50.01 15.711,50.01 v1(16.461,49.26)
EN_3V3_LDO3: U21.5 U33.26 | length 7.9
  TopLayer w0.25: U33.26@17.332,53.729 17.347,53.714 18.883,53.714 21.289,51.308 21.289,50.218 21.998,49.509 U21.5@22.831,49.509
EN_5V: U20.3 U33.27 | length 20.6
  TopLayer w0.25: v1(4.565,59.913) 5.164,60.512 U20.3@6.158,60.512 ; U33.27@17.332,54.379 17.345,54.391 18.482,54.391 v1(18.495,54.404)
  Layer 3 w0.25: v1(4.565,59.913) 4.565,58.451 4.723,58.293 8.415,58.293 8.826,58.704 14.466,58.704 18.447,54.723 18.447,54.451 v1(18.495,54.404)
EN_ANT_SUPP: R32.1 U33.1 | length 1.6
  TopLayer w0.15: U33.1@16.432,55.929 16.432,56.73 v1(17.017,57.315)
EN_LNA: U4.23 U13.6 | length 27.3
  Layer 3 w0.15: 47.8,78 48.148,78.348 49.433,78.348 50.642,78.348 53.128,75.861 53.128,58.597 55.273,56.452 55.704,56.452 55.725,56.474
EN_RF_P: U4.4 U15.14 | length 1.4
  Bottom Layer w0.15: U15.14@47.185,71.632 47.922,70.895 47.922,70.867 48.093,70.696 v1(48.093,70.602)
EN_SPI_AD: R18.2 U4.2 | length 54.9
  TopLayer w0.25: v1(60.303,13.174) 60.303,11.787 60.128,11.612 60.128,10.294 61.809,8.613 R18.2@61.809,8.253
  Layer 2 w0.25: v1(60.303,13.174) 62.184,15.054 62.184,17.002 v1(60.731,18.455)
  Layer 3 w0.25: v1(60.731,18.455) 60.731,21.895 63.4,24.565 63.4,58.976 62.746,59.63
EN_SPI_LMK: R145.2 U4.1 | length 56.5
  TopLayer w0.25: R145.2@54.337,8.553 54.337,11.392 55.497,12.552 v1(55.497,20.788)
  Layer 3 w0.25: v1(55.497,20.788) 58.196,20.788 62.712,25.305 62.712,58.062 61.807,58.967 61.131,58.967
GND: C19.2 C20.2 C34.1 C40.1 C43.1 C49.1 C50.1 C52.1 C54.1 C55.1 C57.1 C58.2 C59.2 C62.1 C64.1 C65.1 C73.1 C74.1 C75.1 C76.1 C79.1 C80.1 C81.1 C88.1 C89.1 C94.1 C95.2 C132.1 C133.1 C134.1 C136.1 C137.1 C138.1 C139.1 C150.1 C151.1 C152.1 C153.1 C154.1 C155.1 C156.1 C157.1 C158.1 C159.1 C160.1 C161.1 C162.1 C163.1 C164.1 C165.1 C166.1 C167.1 C171.2 C172.2 C173.2 C174.1 C180.1 C181.1 C182.1 C184.1 C190.1 C191.1 C192.1 C193.1 C194.1 C195.1 C196.1 C197.1 C198.1 C199.1 C200.1 C201.1 C202.1 C203.1 C204.1 C205.1 C206.1 C207.1 C208.1 C211.1 C212.1 C213.1 C214.1 C215.1 C216.1 C217.1 C218.1 C222.2 C239.2 C240.1 C241.1 C242.1 C243.2 C244.2 D8.2 FB5.2 FB6.2 FB13.2 FB14.2 FB29.2 FB30.2 J8.1 J8.3 J11.1 J11.3 P1.6 P1.8 P1.9 P1.10 P1.16 P1.17 P1.22 P1.23 P1.28 P1.29 P1.34 P1.35 P1.40 P1.41 P1.46 P1.52 R20.1 R25.1 R26.1 R28.1 R35.1 R41.1 R45.1 R47.1 R53.1 R63.1 R65.1 R67.1 R70.1 R71.1 R79.2 R84.1 R97.1 R119.1 U1.16 U1.18 U1.31 U1.33 U1.56 U1.60 U4.6 U4.29 U5.2 U6.4 U8.5 U8.8 U9.57 U10.5 U10.8 U12.2 U16.1 U17.EP U18.3 U18.13 U18.21 U19.4 U19.9 U32.6 U32.7 U33.6 U33.29 | length 177.9
  TopLayer w0.25: v2(8.852,24.994) 8.854,24.992 9.762,24.992 U18.3@9.767,24.987 ; R67.1@11.119,29.83 11.119,30.574 v2(11.126,30.581) ; v1(12.148,57.9) 12.179,57.869 12.884,57.869 C242.1@12.915,57.838 12.915,57.155 13.182,56.887 U33.6@13.182,55.929 ; U19.9@13.106,33.958 13.106,34.037 13.401,34.331 v2(13.401,35.052) ; U18.13@13.717,24.987 v1(14.54,24.987) ; C134.1@18.783,29.31 18.808,29.285 19.317,29.285 19.465,29.137 v1(19.532,29.137) ; C182.1@20.758,32.082 v1(20.758,32.635) C200.1@20.758,33.188 ; C212.1@21.998,35.007 v1(22.748,35.007) C211.1@23.499,35.007 ; C199.1@23.285,26.24 v1(23.993,26.24) C181.1@24.701,26.24 ; C240.1@26.262,42.256 26.272,42.266 26.272,42.816 v1(26.281,42.825) ; v1(26.298,3.26) 26.345,3.212 26.345,1.455 P1.9@26.4,1.4 ; v1(26.649,26.27) 26.649,26.338 26.823,26.512 C190.1@26.823,27.22 26.823,27.27 27.199,27.646 C184.1@27.199,28.227 ; C214.1@26.771,32.222 27.37,32.222 27.37,32.262 27.465,32.357 C213.1@27.465,33.201 ; C202.1@26.823,29.776 26.823,29.826 27.191,30.193 C201.1@27.191,30.767 ; C201.1@27.232,30.712 27.913,30.712 v2(27.955,30.754) ; U32.7@27.524,42.136 27.349,42.136 26.997,42.489 26.904,42.489 v1(26.856,42.536) U32.6@27.524,42.536 ; v1(27.576,36.288) 27.576,36.866 27.847,37.138 C161.1@28.624,37.138 C159.1@28.624,38.112 ; v1(28.3,21.904) 28.368,21.904 28.515,22.051 C152.1@29.195,22.051 ; v1(29.425,19.5) 30.007,19.5 C150.1@30.063,19.557 ; v1(29.786,10.188) v1@29.831,10.188 ; v1@29.832,10.187 U16.1@30.301,10.187 ; C158.1@30.395,39.711 30.704,39.711 31.327,39.088 C215.1@32.029,39.088 ; C160.1@30.842,35.379 30.842,35.389 31.285,35.832 31.285,35.975 v1(31.333,36.023) C218.1@32.055,36.024 ; C151.1@31.342,19.557 31.499,19.4 v1(31.95,19.4) 32.464,19.4 C166.1@32.621,19.557 ; C239.2@31.446,41.763 31.905,42.222 v1(31.905,42.267) ; C215.1@32.028,39.129 32.028,39.679 v2(32.252,39.902) ; v1(32.083,4.424) 32.8,3.708 P1.17@32.8,1.4 ; v1(33.115,39.783) 33.118,39.783 33.556,39.345 33.556,39.166 C216.1@33.581,39.141 34.038,39.141 34.519,38.66 C154.1@34.529,38.66 34.539,38.66 35.019,39.141 C155.1@35.421,39.141 35.421,39.476 35.666,39.72 v1(35.666,39.764) ; C217.1@33.534,35.562 34.076,35.562 34.496,35.982 C157.1@34.546,35.982 34.597,35.932 35.046,35.932 35.256,35.722 C156.1@35.581,35.722 ; C167.1@33.9,19.557 34.157,19.3 v1(34.575,19.3) 34.922,19.3 C195.1@35.179,19.557 ; v1(35.029,3.69) 35.029,3.622 35.098,3.553 35.098,1.502 P1.23@35.2,1.4 ; C174.1@35.306,24.851 v2(36.035,24.851) ; C94.1@36.458,19.557 36.664,19.35 v1(37.175,19.35) 37.53,19.35 C196.1@37.737,19.557 ; v1(37.395,3.622) 37.395,3.555 37.6,3.349 P1.29@37.6,1.4 ; v1(37.7,37.303) 39.111,35.892 C165.1@39.111,34.881 ; C164.1@38.272,33.252 38.272,32.849 38.613,32.507 C194.1@38.613,32.457 38.613,31.769 38.318,31.474 C193.1@38.308,31.474 ; C205.1@39.695,27.541 C204.1@40.529,27.541 40.5,27.513 v1(40.5,26.175) ; v1(39.927,3.493) 39.963,3.456 39.963,1.437 P1.35@40,1.4 ; R97.1@40.718,47.23 R97.1@40.811,47.138 ; R97.1@40.818,47.138 40.827,47.147 40.827,47.875 v1(40.836,47.884) ; C163.1@41.179,32.479 41.183,32.483 41.736,32.483 v1(41.739,32.486) 41.739,32.54 41.82,32.621 C162.1@41.82,33.257 ; C191.1@41.398,30.038 41.798,30.038 41.944,29.891 41.944,29.211 42.108,29.047 42.487,29.047 42.738,28.796 42.738,28.535 v1(42.762,28.511) ; C192.1@41.874,31.442 v1@41.874,32.298 ; v1(42.357,3.922) 42.379,3.901 42.379,1.421 P1.41@42.4,1.4 ; R41.1@43.996,47.139 v1(43.996,47.875) ; 44.551,32.09 44.551,31.903 C80.1@45.404,31.05 ; U12.2@45.76,25.127 45.761,25.126 46.839,25.126 46.986,24.979 46.986,23.984 46.859,23.857 C95.2@46.124,23.857 ; v1(46.755,9.342) C244.2@47.815,9.342 ; C243.2@48.612,7.156 48.972,7.156 49.254,6.874 v1(49.291,6.874) ; U8.5@51.97,7.758 52.384,7.758 v2(52.655,7.488) ; U8.8@51.97,8.958 52.12,8.958 52.357,9.195 52.357,9.545 v2(52.395,9.583) ; v2(55.354,6.866) 55.355,6.867 C19.2@55.895,6.868 C19.2@55.895,6.868 ; v1(56.053,9.259) 56.053,9.73 56.199,9.876 56.205,9.876 56.23,9.901 C20.2@56.23,9.911 ; C132.1@57.593,38.14 57.609,38.125 57.609,37.39 v1(57.625,37.375) ; v1(59.3,39.968) 59.368,39.968 59.651,39.685 C133.1@60.25,39.685 ; U10.5@59.303,7.453 59.453,7.453 59.689,7.216 59.689,7.056 v2(59.728,7.018) ; U10.8@59.478,8.678 59.606,8.807 v2(59.606,9.278) ; C88.1@59.56,28.787 59.56,28.777 59.585,28.752 59.593,28.752 60.178,28.166 C73.1@60.178,27.541 v1(61.392,27.545) ; C89.1@60.77,31.925 60.77,31.241 61.039,30.971 v1(61.039,30.904) ; C50.1@61.189,14.306 61.189,14.485 61.609,14.904 v1(61.609,16.228) ; v1(62.339,18.9) 62.503,18.9 62.778,19.175 R20.1@63.973,19.175 ; v1(63.656,4.54) R70.1@63.656,5.195 ; v1(64.973,4.54) R71.1@64.973,5.195 ; v1(66.275,4.54) R119.1@66.275,5.195 ; v2(67.545,9.274) U6.4@67.545,10.575
  TopLayer w0.268: C59.2@11.642,20.976 11.677,20.941 v2(11.677,20.179) ; v2(14.012,34.519) 14.012,34.124 U19.4@14.017,34.119
  TopLayer w0.3: C54.1@15.508,24.411 v2@16.496,24.411 ; v2(16.188,16.903) 16.188,17.947 C49.1@16.197,17.956 ; v2@16.475,25.752 v2(16.478,25.755)
  TopLayer w0.5: v1(3.842,14.31) R63.1@3.842,15.061 ; v1(4.545,23.65) C55.1@6.049,23.65 ; v1(4.545,26.09) 4.569,26.066 C52.1@6.005,26.066 ; C58.2@9.942,29.662 9.944,29.663 v1(9.944,30.604) ; v1(9.949,33.208) 9.949,33.967 C62.1@9.962,33.98 ; v1(10.423,40.172) C43.1@11.174,40.172 ; v1(10.423,41.64) C40.1@11.174,41.64 ; v1(11.583,7.515) FB6.2@15.065,7.515 ; v1(11.677,31.509) C64.1@12.362,31.509 ; v1(12.362,29.448) C75.1@12.362,30.297 ; v1(13.132,20.054) R65.1@13.132,20.637 ; R53.1@15.946,33.871 v1(15.946,34.651) ; FB13.2@16.245,7.515 v1@16.839,7.515 ; v1(16.839,7.575) v1@16.839,7.515 ; FB30.2@17.426,7.515 v1@16.839,7.515 ; C76.1@19.007,32.707 19.057,32.707 19.584,33.233 v1(19.584,33.288) ; v1(19.657,48.049) C65.1@20.408,48.049 ; C153.1@32.024,22.837 32.028,22.834 v1(32.028,22.323) ; v1(34.629,22.197) C180.1@34.629,22.874 ; v2(35.431,29.7) 35.704,29.972 C206.1@38.427,29.972 ; v2(35.431,31.05) 36.839,32.457 C194.1@38.613,32.457 ; C198.1@37.237,22.914 37.3,22.851 v1(39.127,22.851) ; v1(37.404,53.824) 38.446,54.866 J11.3@40.157,54.866 ; v2(40.13,50.854) 40.157,50.88 J11.1@40.157,51.916 ; v1(44.051,50.854) 44.051,51.641 44.326,51.916 J8.3@44.685,51.916 ; v1(44.685,53.391) J8.1@44.685,54.866 ; v1(61.039,30.904) 61.5,31.365 C79.1@61.5,33.2 ; C74.1@61.5,34.65 61.5,34.7 61.65,34.85 61.7,34.85 63.375,36.525 v1(64.705,36.525)
  Bottom Layer w0.25: v2(5.789,56.842) 5.791,56.841 5.791,55.93 R35.1@5.792,55.928 ; v2(7.024,56.842) 7.026,56.84 7.026,55.929 R45.1@7.027,55.928 ; v2(8.274,56.843) v2(8.274,56.843) 8.276,55.931 R47.1@8.277,55.929 ; P1.6@25.2,1.4 25.2,2.828 v1(26.298,3.925) ; P1.8@26,1.4 26,2.956 26.298,3.254 26.303,3.254 26.8,2.757 P1.10@26.8,1.4 ; P1.16@29.2,1.4 29.2,4.035 v1(29.581,4.417) ; v1(32.685,41.815) cw(c32.685,41.767) 32.733,41.767 R84.1@32.733,40.937 ; v1(34.575,3.7) 34.623,3.652 34.623,3.329 34.8,3.152 P1.22@34.8,1.4 ; R79.2@35.866,40.937 35.866,41.796 v1(35.881,41.796) ; v1(37.041,3.068) 37.041,3.001 37.2,2.841 P1.28@37.2,1.4 ; v1(39.422,3.068) 39.422,3.001 39.6,2.822 P1.34@39.6,1.4 ; FB29.2@39.516,50.839 39.523,50.846 40.123,50.846 v2(40.13,50.854) ; C208.1@40.236,45.481 40.805,45.481 41.079,45.207 v1(41.132,45.207) ; C207.1@40.257,44.676 40.281,44.701 40.813,44.701 v1(40.838,44.725) ; P1.40@42,1.4 42.024,1.424 42.024,3.137 v1(42.048,3.161) ; P1.46@44.4,1.4 v1(44.4,3.254) ; v1(45.121,32.302) 45.168,32.349 45.687,32.349 46.112,32.775 U1.56@48.908,32.775 ; P1.52@46.8,1.4 46.8,2.757 46.95,2.907 v1(46.95,2.975) ; C137.1@55.221,26.176 55.231,26.176 55.521,25.886 v1(55.521,25.861) ; U1.33@57.058,28.625 v1(57.943,28.625) 58.372,29.054 58.372,29.45 58.057,29.765 57.718,29.765 U1.31@57.708,29.775 ; U1.16@57.058,37.425 57.475,37.425 57.525,37.375 v1(57.625,37.375) ; U1.18@57.708,36.275 59.424,36.275 60.625,37.476 60.625,37.482 60.75,37.607 v2(60.75,37.675) ; 58.372,39.646 C136.1@58.372,39.958
  Bottom Layer w0.5: C222.2@25.464,49.179 25.464,48.402 25.757,48.109 26.713,48.109 v1(26.728,48.124) ; C136.1@58.499,39.96 58.507,39.968 v1(59.3,39.968)
  other v1: 9.449,11.903 9.949,11.903 9.449,12.403 9.949,12.403 9.449,12.903 9.949,12.903 9.449,13.403 9.949,13.403 9.45,13.903 9.95,13.903 6.95,14.403 7.45,14.403 7.95,14.403 8.45,14.403 8.95,14.403 9.45,14.403 9.95,14.403 10.45,14.403 10.95,14.403 11.45,14.403 11.949,14.404 6.95,14.903 7.45,14.903 7.95,14.903 8.45,14.903 8.95,14.903 9.45,14.903 9.95,14.903 10.45,14.903 10.95,14.903 11.45,14.903 11.949,14.904 9.45,15.403 9.95,15.403 9.449,15.903 9.949,15.903 9.449,16.403 9.949,16.403 9.449,16.903 9.949,16.903 9.449,17.403 9.949,17.403 47.033,23.964 40.588,24.714
  other v2: 10.842,24.087 11.742,24.087 12.642,24.087 16.497,24.41 10.842,24.987 11.742,24.987 12.642,24.987 10.842,25.887 11.742,25.887 12.642,25.887 31.481,27.1 32.831,27.1 34.181,27.1 30.231,28.35 31.481,28.35 32.831,28.35 34.181,28.35 35.431,28.35 30.231,29.7 31.481,29.7 32.831,29.7 34.181,29.7 30.231,31.05 31.481,31.05 32.831,31.05 34.181,31.05 27.378,32.215 31.481,32.3 32.831,32.3 34.181,32.3 12.712,51.309 13.847,51.309 15.117,51.309 16.252,51.309 12.712,52.444 13.847,52.444 15.117,52.444 16.252,52.444 12.712,53.714 13.847,53.714 15.117,53.714 16.252,53.714 12.712,54.849 13.847,54.849 15.117,54.849 16.252,54.849 76.405,60.218 77.54,60.218 78.81,60.218 79.945,60.218 76.405,61.353 77.54,61.353 78.81,61.353 79.945,61.353 76.405,62.623 77.54,62.623 78.81,62.623 79.945,62.623 76.405,63.758 77.54,63.758 78.81,63.758 79.945,63.758
GND_VCXO: C177.1 C209.1 C210.1 FB29.1 X1.3 | length 9.5
  Bottom Layer w0.25: C209.1@37.639,48.874 37.639,49.398 37.87,49.629 37.87,49.818 ; FB29.1@37.87,50.86 37.87,49.818 ; C210.1@38.664,49.074 38.614,49.074 37.87,49.818
  Bottom Layer w0.5: C177.1@33.207,52.881 34.976,52.881 35.586,52.271 X1.3@35.586,50.86 FB29.1@37.87,50.86
I2C_SCL: R17.2 R51.2 U3.5 U6.6 U16.3 | length 80
  TopLayer w0.15: R51.2@30.2,6.705 30.232,6.673 v1(31.067,6.673) 31.817,6.673 R17.2@31.849,6.705 ; U16.3@31.026,10.109 31.003,10.086 31.051,10.038 31.051,9.236 v1(31.087,9.2)
  TopLayer w0.3: v1(64.953,13.551) 66.275,14.872 U6.6@66.275,15.975
  Layer 2 w0.15: v1(0.5,8.253) 2.265,8.253 4.149,6.369 17.486,6.369 20.111,8.994 23.253,8.994 24.068,8.179 29.859,8.179 30.908,9.228 30.936,9.2 31.238,9.2 31.238,9.223 31.249,9.234 31.603,9.234 33.808,7.029 47.91,7.029 49.64,8.758 53.962,8.758 54.541,8.179 59.92,8.179 64.953,13.213 v1(64.953,13.551)
  Layer 3 w0.15: v1(31.067,6.673) 30.498,7.242 30.498,8.61 v1(31.087,9.2)
  Bottom Layer w0.15: v1(0.5,8.253) v1@0.511,8.263
I2C_SDA: R16.1 R50.2 U3.4 U6.5 U16.4 | length 79.9
  TopLayer w0.15: R50.2@30.2,8.088 31.023,8.088 31.842,8.088 31.842,8.138 31.657,8.323 31.657,9.603 31.401,9.859 31.401,10.084 U16.4@31.376,10.109
  TopLayer w0.3: v1(65.485,13.038) 66.406,13.038 67.545,14.176 U6.5@67.545,15.975
  Layer 2 w0.15: v1(0.5,7.55) 2.173,7.55 3.655,6.069 17.61,6.069 20.235,8.694 23.129,8.694 23.944,7.879 30.066,7.879 30.366,8.179 v1(31.023,8.179) 32.233,8.179 33.684,6.729 48.034,6.729 49.764,8.458 53.837,8.458 54.417,7.879 60.044,7.879 65.202,13.038 v1(65.485,13.038)
  Bottom Layer w0.15: v1(0.5,7.55) 1.059,7.55 1.266,7.758
LMK_CLKin1_N: C225.2 U9.29 | length 1.4
  Bottom Layer w0.24: C225.2@29.468,34.96 cw(c29.468,34.847) 29.581,34.847 29.581,34.386 U9.29@29.581,33.6
LMK_CLKin1_P: C226.2 U9.30 | length 1.4
  Bottom Layer w0.24: U9.30@30.081,33.6 30.081,34.855 cw(c30.187,34.855) C226.2@30.187,34.96
LMK_CLKsel: U9.34 U32.12 | length 9.6
  TopLayer w0.15: U32.12@29.324,41.536 29.324,41.044 30.056,40.313 30.647,40.313 31.108,39.852 v2(31.377,39.852)
  Bottom Layer w0.279: v2(31.377,39.852) 31.377,39.506 32.081,38.801 U9.34@32.081,33.6
LMK_CLKsel_3.3: U32.1 U33.3 | length 27.4
  TopLayer w0.15: v1(26.048,44.748) 26.077,44.777 28.744,44.777 29.324,44.197 U32.1@29.324,43.086
  TopLayer w0.25: U33.3@15.132,55.929 15.132,56.74 16.426,58.034 18.708,58.034 20.723,56.019 v1(20.723,54.282)
  Layer 2 w0.25: v1(20.723,54.282) 23.314,54.282 23.998,53.598 23.998,52.204 25.481,50.721 25.481,45.315 v1(26.048,44.748)
NetC1_1: C1.1 R2.2 R3.1 R6.2 | length 2.6
  Bottom Layer w0.268: R3.1@51.436,43.156 C1.1@51.436,43.949 R6.2@51.436,44.676 R2.2@51.436,45.481
  Bottom Layer w0.269: R2.2@51.259,45.658 cw(c51.259,45.481) R2.2@51.436,45.481
NetC2_1: C2.1 R3.2 R4.1 | length 1.8
  Bottom Layer w0.268: R4.1@51.279,40.841 ccw(c51.279,40.999) 51.436,40.999 C2.1@51.436,41.775 R3.2@51.436,42.506
NetC3_2: C3.2 R1.1 | length 0.8
  Bottom Layer w0.268: R1.1@51.42,49.223 C3.2@51.42,50.048
NetC4_2: C4.2 R5.1 R9.2 | length 5.4
  TopLayer w0.268: v2(50.047,47.729) ccw(c50.717,47.729) 50.717,47.06 C4.2@51.825,47.06 52.793,47.06 ccw(c52.793,47.729) v2(53.462,47.729)
  Bottom Layer w0.268: v2(50.047,47.729) R5.1@50.725,47.729 ; R9.2@52.879,47.724 53.462,47.724 v2(53.462,47.729)
NetC5_1: C5.1 R8.2 | length 2.4
  TopLayer w0.268: C5.1@52.058,45.294 52.864,45.294 cw(c52.864,44.686) v1(53.472,44.686)
  Bottom Layer w0.268: R8.2@52.856,44.676 53.472,44.676 v1(53.472,44.686)
NetC5_2: C5.2 R6.1 | length 2.3
  TopLayer w0.268: v1(50.175,44.676) cw(c50.794,44.676) 50.794,45.294 C5.2@51.538,45.294
  Bottom Layer w0.268: v1(50.175,44.676) R6.1@50.786,44.676
NetC6_2: C6.2 R10.1 | length 0.8
  Bottom Layer w0.268: R10.1@52.195,49.223 C6.2@52.195,50.048
NetC7_2: C7.2 R8.1 R11.2 R12.1 | length 2.6
  Bottom Layer w0.268: R12.1@52.206,43.156 C7.2@52.206,43.949 R8.1@52.206,44.676 R11.2@52.206,45.52
  Bottom Layer w0.269: R11.2@52.206,45.52 cw(c52.343,45.52) R11.2@52.343,45.658
NetC8_2: C8.2 R12.2 R13.1 | length 1.7
  Bottom Layer w0.268: R12.2@52.206,42.506 C8.2@52.206,41.775 52.206,40.985 ccw(c52.349,40.985) R13.1@52.349,40.841
NetC11_1: C11.1 U2.13
NetC12_1: C12.1 U2.11
NetC13_1: C13.1 U2.10
NetC14_1: C14.1 U2.6 U2.7 U2.8 U2.9
NetC21_1: C21.1 J2.1 L2.1 | length 24.8
  Bottom Layer w0.268: J2.1@5.658,67.694 10.594,67.694 cw(c10.618,67.694) 10.618,67.718 11.898,67.718 ccw(c11.898,68.887) 13.066,68.887 13.066,76.034 cw(c14.225,76.034) 14.225,77.193 L2.1@20.723,77.193 C21.1@21.98,77.193
NetC21_2: C21.2 C252.2 D1.1 | length 2.8
  Bottom Layer w0.268: C21.2@22.5,77.193 23.56,77.193 D1.1@25.299,77.193
NetC22_1: C22.1 D5.1 L4.2 | length 8
  Bottom Layer w0.268: D5.1@27.39,66.958 27.39,65.101 ccw(c29.372,65.101) 29.372,63.12 L4.2@30.923,63.12 C22.1@32.412,63.12
NetC22_2: C22.2 C253.2 R40.1 | length 2.3
  Bottom Layer w0.268: C22.2@32.932,63.12 C253.2@34.022,63.12 R40.1@35.227,63.12
NetC25_1: C25.1 U2.15
NetC25_2: C25.2 C256.2 L1.1
NetC28_1: C28.1 C257.2 U14.1
NetC28_2: C28.2 FL1.A
NetC29_1: C29.1 C258.2 FL1.D
NetC29_2: C29.2 U13.3
NetC31_2: C31.2 L3.1 R46.1
NetC32_1: C32.1 R102.1
NetC34_2: C34.2 U5.4
NetC41_1: C41.1 R57.1 R58.2 U7.16 | length 3.7
  TopLayer w0.2: R58.2@16.116,45.357 16.141,45.332 17.341,45.332 17.341,44.682 17.731,44.292 C41.1@17.731,44.282 17.731,44.272 17.681,44.222 17.51,44.222 16.97,43.683 U7.16@16.97,43.398
NetC41_2: C41.2 C42.2 C71.2 FB31.1 R57.2 U7.14 U7.15
NetC45_1: C45.1 R59.1 R60.2 U7.10 | length 3.6
  TopLayer w0.2: R60.2@16.314,37.587 17.496,37.587 17.541,37.632 17.541,38.072 17.756,38.287 C45.1@17.756,38.657 17.747,38.667 17.466,38.667 16.97,39.163 U7.10@16.97,39.448
NetC45_2: C45.2 C46.2 C67.2 FB7.1 R59.2 U7.11 U7.12
NetC47_1: C47.1 U7.19 | length 2.1
  TopLayer w0.25: C47.1@14.916,45.318 14.916,44.631 15.47,44.077 U7.19@15.47,43.398
NetC51_1: C51.1 U7.7 | length 2.3
  TopLayer w0.2: C51.1@14.16,38.022 C51.1@14.2,38.022 ; C51.1@14.205,38.022 C51.1@14.2,38.022 ; U7.7@15.47,39.448 15.47,38.817 15.134,38.48 14.658,38.48 C51.1@14.2,38.022
NetC53_1: C53.1 R64.1 R65.2 U18.10 | length 3.8
  TopLayer w0.2: U18.10@12.742,23.012 12.742,21.902 13.051,21.593 R65.2@13.101,21.593 14.156,21.593 R64.1@14.281,21.718 ; R64.1@14.281,21.734 R64.1@14.281,21.718 ; C53.1@14.339,20.784 14.339,20.794 14.281,20.852 R64.1@14.281,21.718
NetC56_1: C56.1 R66.1 R67.2 U18.16 | length 4.9
  TopLayer w0.25: 12.826,28.83 13.133,29.137 C56.1@13.757,29.137
  TopLayer w0.3: R67.2@11.123,28.83 12.826,28.83 13.432,28.223 R66.1@13.432,28.173 13.357,28.098 13.357,27.842 U18.16@12.752,27.237
NetC58_1: C58.1 U18.19 | length 2.4
  TopLayer w0.2: C58.1@9.942,28.612 10.008,28.546 10.45,28.546 11.242,27.754 U18.19@11.242,26.962
NetC59_1: C59.1 U18.7 | length 2.1
  TopLayer w0.15: C59.1@10.578,21.203 10.578,21.758 11.242,22.422 U18.7@11.242,23.012
NetC63_2: C63.2 U20.4 | length 2.2
  TopLayer w0.3: C63.2@7.78,59.049 8.309,59.049 8.758,59.498 U20.4@8.758,60.512
NetC64_2: C64.2 C75.2 FB32.1 R19.2 U19.1 U19.2
NetC66_2: C66.2 C77.2 FB4.1 R56.2 U21.1 U21.2 | length 5.4
  TopLayer w0.25: U21.1@24.631,48.009 25.056,48.009 25.731,47.334 R56.2@25.781,47.334
  TopLayer w0.4: C66.2@24.631,46.876 U21.1@24.631,48.009 24.631,48.384
  TopLayer w0.5: C66.2@24.631,46.876 24.638,46.869 24.638,45.716 C77.2@24.646,45.709 24.646,45.732 24.671,45.757 25.841,45.757 FB4.1@25.889,45.806
NetC82_1: C82.1 R88.1 U15.1 | length 8.9
  Bottom Layer w0.268: C82.1@39.658,65.995 39.658,67.431 cw(c40.445,67.431) 40.445,68.218 R88.1@41.782,68.218 41.941,68.218 ccw(c41.941,70.758) 43.737,68.962 U15.1@45.7,70.925
NetC82_2: C82.2 R86.2 R87.2 | length 2.5
  Bottom Layer w0.268: R86.2@38.302,65.475 C82.2@39.658,65.475 R87.2@40.845,65.475
NetC85_2: C85.2 R106.1
NetC171_1: C171.1 U9.42 | length 1.9
  Bottom Layer w0.25: U9.42@36.081,33.6 36.081,33.77 36.086,33.775 36.488,33.775 37.108,34.394 C171.1@37.108,34.87